# Altium PCB IOTv1.5.PcbDoc
Units mm, origin at the board's own origin, x right, y up, seen from the top; angles counter-clockwise.
Board outline 74.6 x 89.6 mm, 2 copper layers (Top Layer, Bottom Layer); 108 components, 83 nets, 385 pads, 75 vias.
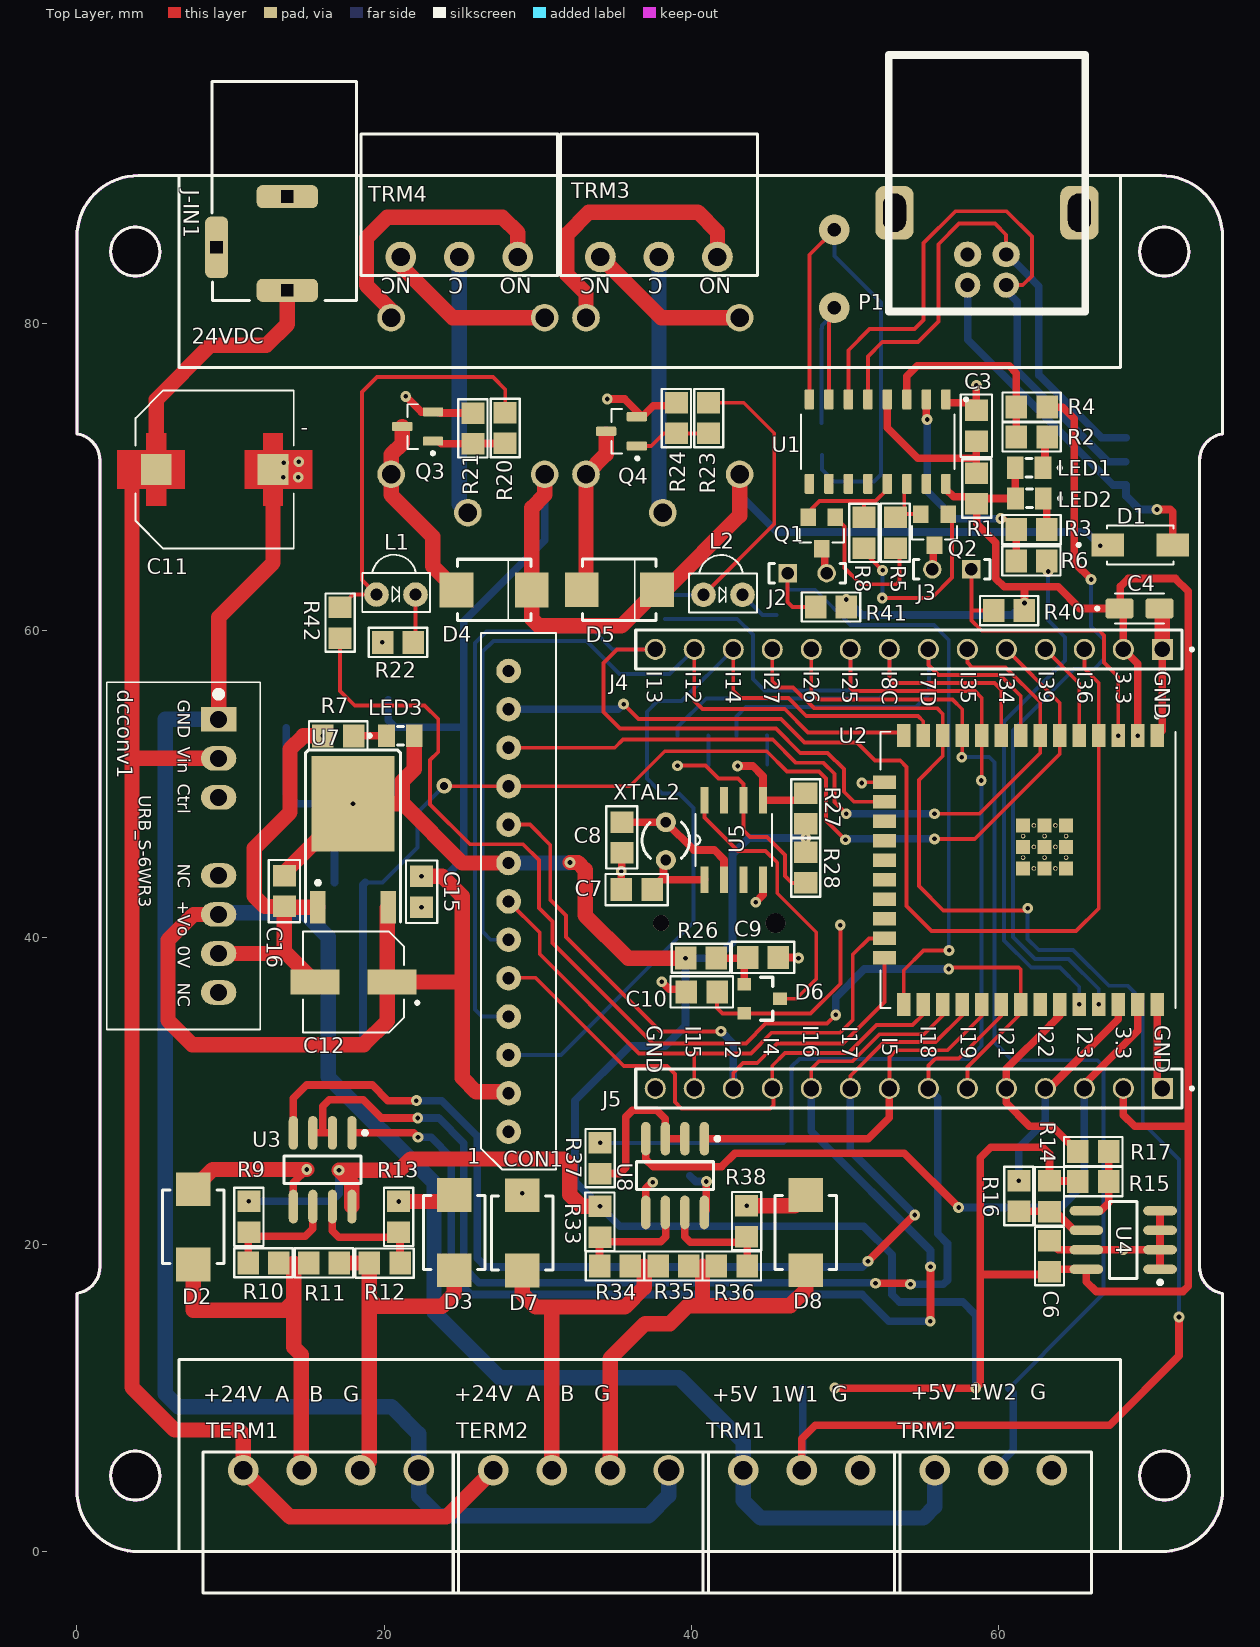
[diagram p0: Top Layer view]
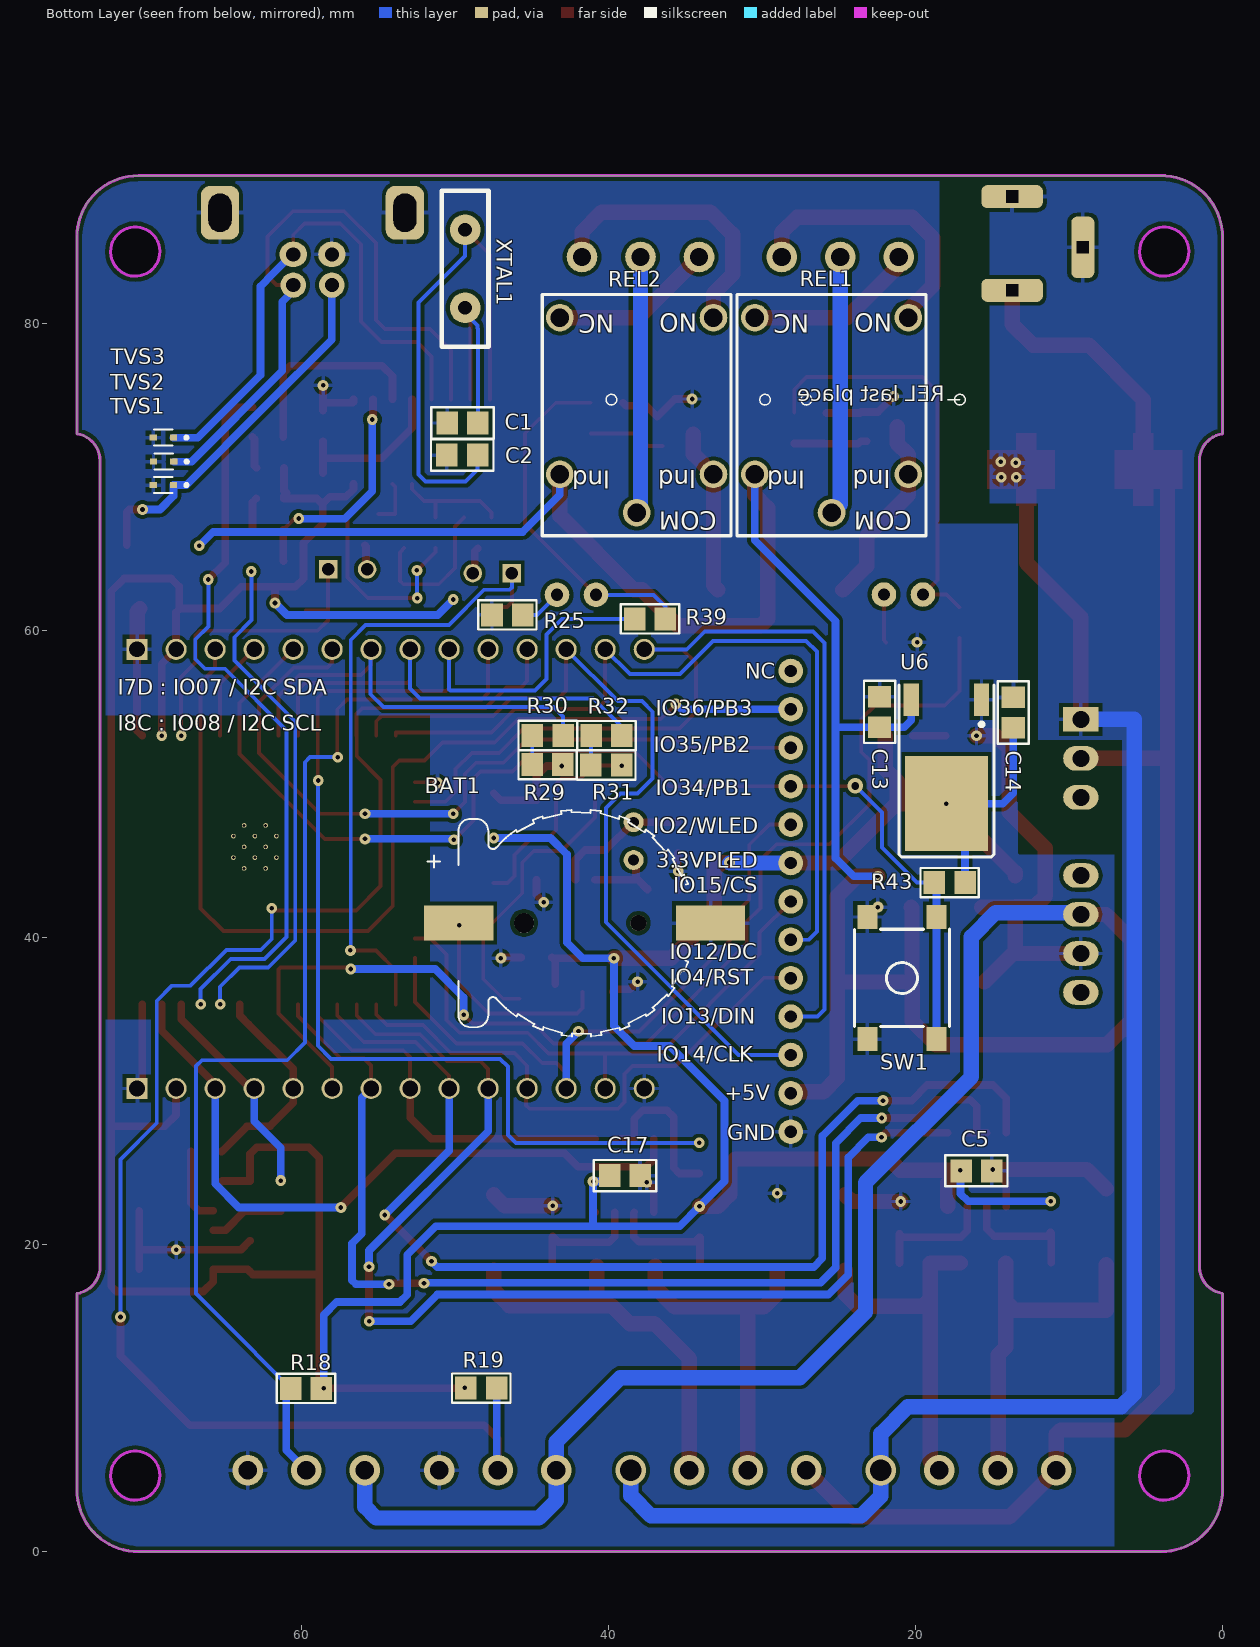
[diagram p1: Bottom Layer view, seen from below]
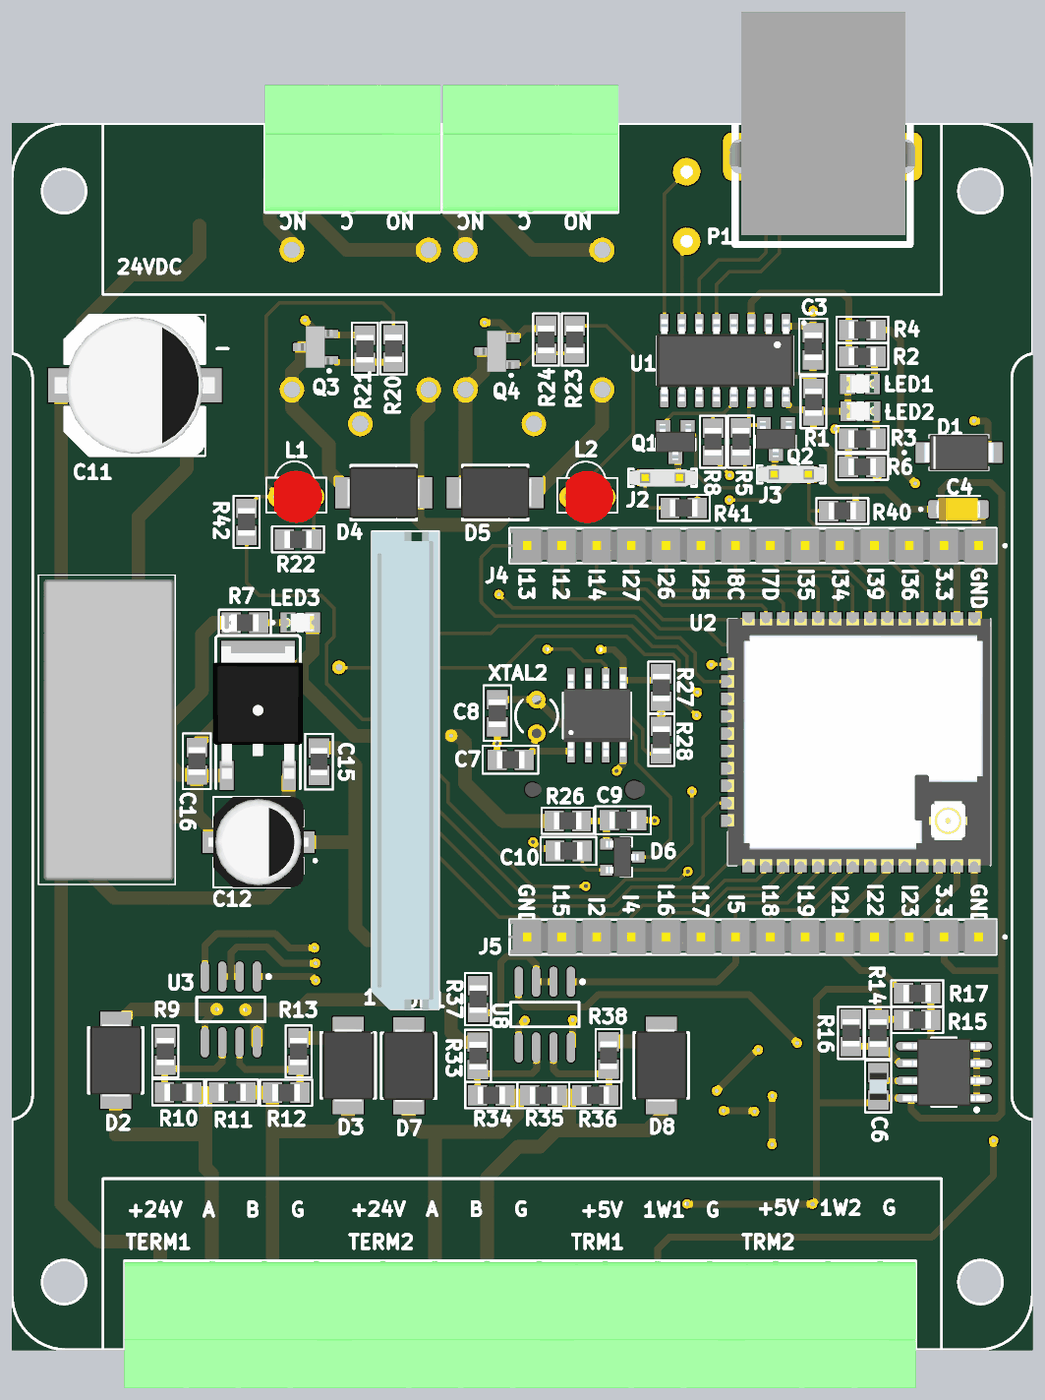
[diagram p2: 3D render of the assembled board from above, using the file's embedded part models]
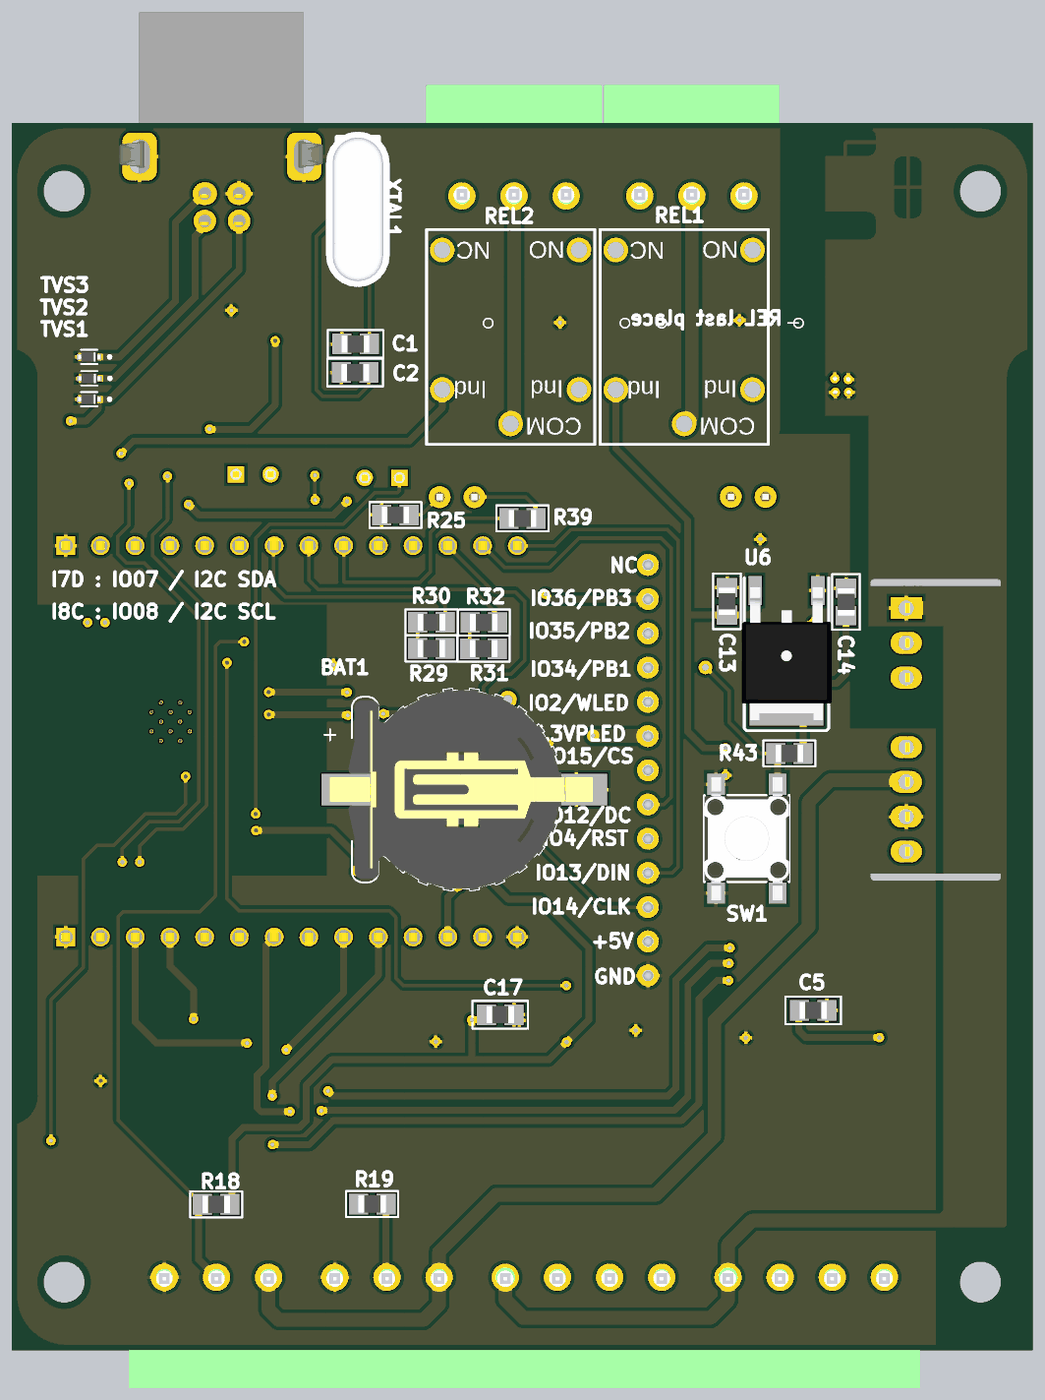
[diagram p3: 3D render of the assembled board from below, using the file's embedded part models]

## Layer stack, top to bottom
Top Solder: solder mask 0.0102, Solder Resist, Dk 3.5
Top Layer: signal copper 0.0356
Dielectric 1: dielectric 0.32, FR-4, Dk 4.8
Bottom Layer: signal copper 0.0356
Bottom Solder: solder mask 0.0102, Solder Resist, Dk 3.5

## Board outline
0,4 ccw(c4,4) 4,0 70.6,0 ccw(c70.6,4) 74.6,4 74.6,16.818 cw(c74.85,18.55) 73.1,18.55 73.1,71.05 cw(c74.85,71.05) 74.6,72.782 74.6,85.6 ccw(c70.6,85.6) 70.6,89.6 4,89.6 ccw(c4,85.6) 0,85.6 0,72.782 cw(c-0.25,71.05) 1.5,71.05 1.5,18.55 cw(c-0.25,18.55) 0,16.818

## Design rules (kind name [scope] priority, off if disabled: settings)
Clearance [All] p1: gap=0.254 ignorepadtopadclearanceinfootprint=FALSE
PolygonConnect [All] p1: connectstyle=Relief reliefconductorwidth=0.254 reliefentries=4 polygonreliefangle="90 Angle" airgapwidth=0.254
RoutingVias [All] p1: holewidth=0.711 width=1.27 viastyle="Through Hole" minholewidth=0.711 minwidth=1.27 maxholewidth=0.711 maxwidth=1.27
SolderMaskExpansion [All] p1: expansion=0.102 istentingtop=FALSE
UnRoutedNet [All] p1: checkbadconnections=TRUE
Width [All] p1: maxlimit=2 minlimit=0.254 preferedwidth=0.5
29 further rules are at their usual default settings.

## Classes and differential pairs
component class U_Temp_Sensor: R18 R19 TRM1 TRM2
component class U_RTC: BAT1 C7 C8 C9 C10 D6 R26 R27 R28 R29 R30 R31 R32 U5 XTAL2
component class U_RS485: C5 C17 D2 D3 D7 D8 R9 R10 R11 R12 R13 R33 R34 R35 R36 R37 R38 TERM1 TERM2 U3 U8
component class U_Relay: D4 D5 L1 L2 Q3 Q4 R20 R21 R22 R23 R24 R25 R39 R42 REL1 REL2 TRM3 TRM4
component class U_Power: C11 C12 C13 C14 C15 C16 dcconv1 J-IN1 U6 U7
component class U_OLED_LED_Connector: CON1
component class U_ESP32-S3: C1 C2 C3 C4 D1 J2 J3 J4 J5 LED1 LED2 LED3 P1 Q1 Q2 R1 R2 R3 R4 R5 R6 R7 R8 R40 R41 R43 SW1 TVS1 TVS2 TVS3 U1 U2 XTAL1
component class U_E2PROM: C6 R14 R15 R16 R17 U4

## Components (designator, comment, footprint, x,y, rotation, side; value= is the part's Value field where it differs from the comment)
BAT1 "CR1220" CR1220 41.76,40.93 r270 bottom
C1 "22pF" 0805#1 49.49,73.49 r180 bottom
C2 "22pF" 0805#1 49.51,71.4 r180 bottom
C3 "100nF" 0805#1 58.57,73.31 r270 top
C4 "100uf 10V TAN" TAN_SIZE_A 69.19,61.41 r0 top
C5 "100nF" 0805#1 16.03,24.8 r180 bottom
C6 "100nF" C0805 63.33,19.24 r270 top
C7 "18pF" 0805#2 36.45,43.11 r0 top
C8 "18pF" 0805#2 35.48,46.51 r90 top
C9 "100nF" 0805#2 44.67,38.69 r0 top
C10 "100nF" 0805#2 40.69,36.45 r180 top
C11 "CAP_EEEFKJ101V" CAP_EEEFK1J101V 8.97,70.46 r0 top
C12 "CAP_EEE1EA220AP" CAP_EEE1EA220AP 18.01,37.09 r180 top
C13 "100nF" 0805#1 22.33,54.68 r270 bottom
C14 "100nF" 0805#1 13.63,54.64 r270 bottom
C15 "100nF" 0805#2 22.44,42.97 r90 top
C16 "100nF" 0805#2 13.51,43.01 r90 top
C17 "100nF" 0805#1 38.91,24.48 r180 bottom
CON1 "10 Pin" "Mini SPOX 5267 - 13Pin" 28.11,27.342 r270 top
D1 "SS14" SS14 69.23,65.55 r0 top
D2 "TVS DIODE" DO-214AA 7.58,21.15 r270 top
D3 "TVS DIODE" DO-214AA 24.57,20.78 r270 top
D4 "Diode 1N5819" DO-214AA 27.17,62.62 r0 top
D5 "Diode 1N5819" DO-214AA 35.32,62.63 r0 top
D6 "BAS70-05" BAS70-05 44.61,36 r270 top
D7 "TVS DIODE" DO-214AA 28.99,20.75 r270 top
D8 "TVS DIODE" DO-214AA 47.46,20.78 r270 top
dcconv1 "URB_S-6WRS" DCDC 9.23,45.3 r270 top
J2 "HDR_1x2_MALE_2.54mm" HDR_1x2_MALE_2.54mm 47.55,63.71 r90 top
J3 "HDR_1x2_MALE_2.54mm" HDR_1x2_MALE_2.54mm 56.97,63.96 r270 top
J4 "HDR_1x14_MALE_2.54mm" HDR_1x14_MALE_2.54mm 54.17,58.75 r180 top
J5 "HDR_1x14_MALE_2.54mm" HDR_1x14_MALE_2.54mm 54.17,30.16 r180 top
J-IN1 "DCJ250-10-A_XX-X_REVA" "dc power jack" 13.7,95.73 r180 top
L1 "Green" LED-1 20.78,62.32 r90 top
L2 "Green" LED-1 42.07,62.3 r90 top
LED1 "RXD" LED-0805-G 62,70.57 r180 top
LED2 "TXD" LED-0805-G 62.02,68.58 r180 top
LED3 "POW" LED-0805-G 21.07,53.13 r0 top
P1 "440206-1" USB 58,82.47 r0 top
Q1 "S8050" S8050 48.5,66.33 r180 top
Q2 "S8050" S8050 55.84,66.54 r180 top
Q3 "NPN" MMBT2222A 22.19,73.26 r180 top
Q4 "NPN" MMBT2222A 35.46,72.95 r180 top
R1 "0R" R0805#1 58.59,69.23 r90 top
R2 "1K" R0805#1 62.17,72.58 r180 top
R3 "1K" R0805#1 62.16,66.55 r180 top
R4 "470R" R0805#1 62.17,74.52 r0 top
R5 "10K" R0805#1 53.29,66.35 r270 top
R6 "470R" R0805#1 62.15,64.51 r0 top
R7 "1K" R0805#1 17.02,53.12 r180 top
R8 "10K" R0805#1 51.25,66.34 r270 top
R9 "4.7K" R0805#1 11.2,21.8 r90 top
R10 "56R" R0805#1 12.15,18.81 r0 top
R11 "120R" R0805#1 16.09,18.8 r180 top
R12 "56R" R0805#1 20.04,18.79 r180 top
R13 "4.7K" R0805#1 20.95,21.8 r270 top
R14 "4.7K" R0805#1 63.33,23.14 r90 top
R15 "4.7K" R0805#1 66.18,24.1 r180 top
R16 "22R" R0805#1 61.33,23.16 r90 top
R17 "22R" R0805#1 66.18,26.05 r180 top
R18 "4.7K" R0805#1 59.68,10.63 r180 bottom
R19 "4.7K" R0805#1 48.27,10.65 r0 bottom
R20 "1K" R0805#1 27.89,73.16 r270 top
R21 "10K" R0805#1 25.79,73.14 r270 top
R22 "1K" R0805#1 20.91,59.21 r0 top
R23 "1K" R0805#1 41.14,73.81 r270 top
R24 "10K" R0805#1 39.04,73.81 r270 top
R25 "1K" R0805#1 46.57,60.99 r180 bottom
R26 "22R" R0805#1 40.63,38.64 r180 top
R27 "2.2K" R0805#1 47.46,48.39 r270 top
R28 "2.2K" R0805#1 47.46,44.55 r90 top
R29 "22R" R0805#1 43.95,51.24 r0 bottom
R30 "0R" R0805#1 43.94,53.15 r180 bottom
R31 "22R" R0805#1 40.13,51.22 r0 bottom
R32 "0R" R0805#1 40.11,53.14 r180 bottom
R33 "4.7K" R0805#1 34.06,21.48 r90 top
R34 "56R" R0805#1 35.03,18.6 r0 top
R35 "120R" R0805#1 38.84,18.6 r180 top
R36 "56R" R0805#1 42.64,18.6 r180 top
R37 "0R" R0805#1 34.07,25.62 r90 top
R38 "4.7K" R0805#1 43.61,21.52 r270 top
R39 "0R" R0805#1 37.28,60.74 r180 bottom
R40 "10K" R0805#1 60.7,61.28 r0 top
R41 "10K" R0805#1 49.1,61.51 r0 top
R42 "0R" R0805#1 17.14,60.49 r90 top
R43 "10K" R0805#2 17.77,43.57 r180 bottom
REL1 "Milon mini 5v relay" HLS-T78-DC5V 25.46,74 r0 bottom
REL2 "Milon mini 5v relay" HLS-T78-DC5V 38.15,74 r0 bottom
SW1 "Tactile-Switch" SW-Tactile-SMD 20.88,37.35 r270 bottom
TERM1 "MC 1,5/ 4-G-3,81" "MC 1,5/ 4-G-3,81" 16.54,1.9 r0 top
TERM2 "MC 1,5/ 4-G-3,81" "MC 1,5/ 4-G-3,81" 32.82,1.9 r0 top
TRM1 "MC 1,5/ 3-G-3,81" "MC 1,5/ 3-G-3,81" 47.19,1.9 r0 top
TRM2 "MC 1,5/ 3-G-3,81" "MC 1,5/ 3-G-3,81" 59.66,1.9 r0 top
TRM3 "MC 1,5/ 3-G-3,81" "MC 1,5/ 3-G-3,81" 37.9,87.7 r180 top
TRM4 "MC 1,5/ 3-G-3,81" "MC 1,5/ 3-G-3,81" 24.9,87.7 r180 top
TVS1 "LESD5D5.0CT1G" TVS 68.97,69.45 r0 bottom
TVS2 "LESD5D5.0CT1G" TVS 68.949,70.972 r0 bottom
TVS3 "LESD5D5.0CT1G" TVS 68.97,72.54 r0 bottom
U1 "CH340G" CH340G 52.14,72.28 r270 top
U2 "ESP32_WROOM_32UE" ESP32_WROOM_32UE(M113EH6400UH3Q0) 61.939,44.387 r270 top
U3 "ADM3485" NSO8_N 16,24.87 r270 top
U4 "AT24C512C-SSHD" 8S1_N 68.129,20.291 r180 top
U5 "RTC" PCF8563T 42.77,46.34 r90 top
U6 "LD1117-33" TO-252 17.98,52.09 r0 bottom
U7 "LD1117-33" TO-252 17.98,45.33 r0 top
U8 "ADM3485" NSO8_N 38.95,24.49 r270 top
XTAL1 "12MHZ" XTAL-1 49.32,83.32 r90 bottom
XTAL2 "32.768KHZ" R38 38.35,46.33 r0 top

## Footprints (in the part's own frame and the unit in brackets; to place one, negate y for a bottom-side part, rotate by r counter-clockwise, add the part's x,y. Pads: shape width x height; smd on the part's side, far side on the other; paste and mask are expansions set on the pad)
8S1_N [mm] "SOIC, 8-Leads, Body 4.9x3.9mm, Pitch 1.27mm, IPC Medium Density"
  oval 2.2x0.6 smd: 1(-2.4,1.905) 2(-2.4,0.635) 3(-2.4,-0.635) 4(-2.4,-1.905) 5(2.4,-1.905) 6(2.4,-0.635) 7(2.4,0.635) 8(2.4,1.905)
  silkscreen extent -2.53,-2.5 0.9,2.88, body extent -3,-2.45 3,2.45, height 1.75
0805#1 [mm]
  rect 1.4x1.5 smd: 1(-1,0) 2(1,0)
  silkscreen extent -2.03,-1.02 2.03,1.02, body extent -1,-0.63 1,0.63, height 0.58
0805#2 [mm]
  rect 1.4x1.5 smd mask+0.102: 1(-1,0) 2(1,0)
  silkscreen extent -2.03,-1.02 2.03,1.02, body extent -1,-0.63 1,0.63, height 0.58
BAS70-05 [mm] "Common cathode dual schottky diode"
  rect 0.8x0.9 smd: 1(-0.95,-1.15) 2(0.95,-1.15) 3(0,1.175)
  silkscreen extent -1.4,-0.1 1.4,0.7, body extent -1.46,-1.2 1.46,1.2, height 1.2
C0805 [mm]
  rect 1.4x1.5 smd mask+0.102: 1(-1,0) 2(1,0)
  silkscreen extent -1.9,-0.95 1.9,0.95, body extent -1,-0.63 1,0.63, height 1.26
CAP_EEE1EA220AP [mm]
  rect 3.2x1.6 smd: 1(-2.5,0) 2(2.5,0)
  silkscreen extent -4.25,-3.3 3.3,3.3, body extent -3.65,-3.3 3.65,3.3, height 5.8
CAP_EEEFK1J101V [mm]
  rect 2x2 smd paste-2 mask+0: 1(-3.8,0) 2(3.8,0)
  Top Layer region: 4.45,1.25 6.35,1.25 6.35,-1.25 4.45,-1.25 4.45,-2.35 3.15,-2.35 3.15,-1.25 1.95,-1.25 1.95,1.25 3.15,1.25 3.15,2.35 4.45,2.35
  Top Layer region: -3.15,1.25 -1.95,1.25 -1.95,-1.25 -3.15,-1.25 -3.15,-2.35 -4.45,-2.35 -4.45,-1.25 -6.35,-1.25 -6.35,1.25 -4.45,1.25 -4.45,2.35 -3.15,2.35
  silkscreen extent -5.15,-5.15 5.15,5.15, body extent -5.85,-5.15 5.85,5.15, height 10.2
CH340G [mm] "USB to Serial Converter"
  rrect25% 1.31x0.62 smd: 1(-2.75,4.445) 2(-2.75,3.175) 3(-2.75,1.905) 4(-2.75,0.635) 5(-2.75,-0.635) 6(-2.75,-1.905) 7(-2.75,-3.175) 8(-2.75,-4.445) 9(2.75,-4.445) 10(2.75,-3.175) 11(2.75,-1.905) 12(2.75,-0.635) 13(2.75,0.635) 14(2.75,1.905) 15(2.75,3.175) 16(2.75,4.445)
  silkscreen extent -2.85,-5 1.78,5.85, body extent -3,-5 3,5, height 1.8
CR1220 [mm] "SMD RTC Battery Holder"
  rect 2.3x4.5 smd: N(0,8.425) P(0,-7.975)
  round 1.3 hole 1.3 unplated: ""(0,-3.725)
  round 1.05 hole 1.05 unplated: ""(0,3.725)
  silkscreen extent -7.37,-10 7.37,6.96, body extent -7.37,-9.6 7.37,9.6, height 4.25
"dc power jack" [mm]
  rrect50% 4x1.5 hole 0.8 square: 1(0,7.5) 2(0,13.6)
  rrect50% 1.5x4 hole 0.8 square: 3(4.6,10.8)
  silkscreen extent -4.5,0 4.9,14.27, body extent -4.52,0.07 4.88,14.27, height 11.01
DCDC [mm]
  rect 1.6x2.3 hole 1.1: 1(-8.89,0)
  oval 1.6x2.3 hole 1.1: 2(-6.35,0) 3(-3.81,0) 5(1.27,0) 6(3.81,0) 7(6.35,0) 8(8.89,0)
  silkscreen extent -11.3,-7.3 11.3,2.7, body extent -11,-6.91 11,2.59, height 11.51
DO-214AA [mm] "Molded Diode, 2-Leads, Body 4.4x3.6mm, IPC Medium Density"
  rect 2.2x2.26 smd mask+0.102: 1(-2.45,0) 2(2.45,0)
  silkscreen extent -2.4,-2 2.4,2, body extent -2.7,-1.85 2.7,1.85, height 2.19
ESP32_WROOM_32UE(M113EH6400UH3Q0) [mm]
  rect 1.5x0.9 smd: 1(-8.75,8.41) 2(-8.75,7.14) 3(-8.75,5.87) 4(-8.75,4.6) 5(-8.75,3.33) 6(-8.75,2.06) 7(-8.75,0.79) 8(-8.75,-0.48) 9(-8.75,-1.75) 10(-8.75,-3.02) 11(-8.75,-4.29) 12(-8.75,-5.56) 13(-8.75,-6.83) 14(-8.75,-8.1) 25(8.75,-8.1) 26(8.75,-6.83) 27(8.75,-5.56) 28(8.75,-4.29) 29(8.75,-3.02) 30(8.75,-1.75) 31(8.75,-0.48) 32(8.75,0.79) 33(8.75,2.06) 34(8.75,3.33) 35(8.75,4.6) 36(8.75,5.87) 37(8.75,7.14) 38(8.75,8.41)
  rect 0.9x1.5 smd: 15(-5.71,-9.35) 16(-4.44,-9.35) 17(-3.17,-9.35) 18(-1.9,-9.35) 19(-0.63,-9.35) 20(0.64,-9.35) 21(1.91,-9.35) 22(3.18,-9.35) 23(4.45,-9.35) 24(5.72,-9.35)
  rect 0.9x0.9 smd: 39_1(-2.9,2.47) 39_2(-1.5,2.47) 39_3(-0.1,2.47) 39_4(-2.9,1.07) 39_5(-1.5,1.07) 39_6(-0.1,1.07) 39_7(-2.9,-0.33) 39_8(-1.5,-0.33) 39_9(-0.1,-0.33)
  round 0.3 hole 0.2: 39_10(-2.2,2.47) 39_11(-0.8,2.47) 39_12(-2.9,1.77) 39_13(-1.5,1.77) 39_14(-0.1,1.77) 39_15(-2.2,1.07) 39_16(-0.8,1.07) 39_17(-2.9,0.37) 39_18(-1.5,0.37) 39_19(-0.1,0.37) 39_20(-2.2,-0.33) 39_21(-0.8,-0.33)
  silkscreen extent -10.1,-9.6 9,9.6, body extent -9,-9.6 9,9.6, height 3.35
HDR_1x2_MALE_2.54mm [mm]
  rect 1.2x1.2 / inner round 1.01 / far side rect 1.2x1.2 hole 0.8: 01(0,1.27)
  round 1.2 hole 0.8: 02(0,-1.27)
  silkscreen extent -0.64,-2.49 0.64,2.49, body extent -0.64,-2.54 0.64,2.44, height 7.47
HDR_1x14_MALE_2.54mm [mm]
  rect 1.37x1.37 hole 1.02: 01(-16.51,0)
  round 1.37 hole 1.02: 02(-13.97,0) 03(-11.43,0) 04(-8.89,0) 05(-6.35,0) 06(-3.81,0) 07(-1.27,0) 08(1.27,0) 09(3.81,0) 10(6.35,0) 11(8.89,0) 12(11.43,0) 13(13.97,0) 14(16.51,0)
  silkscreen extent -18.53,-1.27 17.78,1.27, body extent -17.78,-1.27 17.91,1.27, height 5.21
HLS-T78-DC5V [mm] "Milon mini 5V relay"
  round 1.8 hole 1.2 mask+0.05: 1(0,6.35) 2(-5,3.85) 3(5,3.85) 4(-5,-6.35) 5(5,-6.35)
  silkscreen extent -6.15,-7.85 6.15,7.85, body extent -6.15,-7.85 6.15,7.85, height 14
LED-1 [mm] "LED; 2 Leads"
  round 1.6 hole 0.8: 1(0,1.27) 2(0,-1.27)
  silkscreen extent -1.14,-2.2 2.59,2.2, body extent -1.9,-1.9 1.9,1.6, height 6.5
LED-0805-G [mm]
  rect 1.1x1.45 smd: 1(0.9,0) 2(-0.9,0)
  silkscreen extent -2.1,-0.6 0.2,0.6, body extent -1,-0.63 1,0.63, height 0.7
"MC 1,5/ 3-G-3,81" [mm] "Phoenix board mount 3.81 Pitch Terminal 3Position"
  round 2 hole 1.2 mask+0.05: 1(-3.81,3.4) 2(0,3.4) 3(3.81,3.4)
  silkscreen extent -6.41,-4.6 6.41,4.6, body extent -6.41,-4.7 6.41,4.6, height 7.26
"MC 1,5/ 4-G-3,81" [mm]
  round 2 hole 1.2 mask+0.05: 1(-5.715,3.4) 2(-1.905,3.4) 3(1.905,3.4)
  round 2 hole 1.4 mask+0.05: 4(5.715,3.4)
  silkscreen extent -8.31,-4.6 8.31,4.6, body extent -8.31,-4.7 8.31,4.6, height 7.26
"Mini SPOX 5267 - 13Pin" [mm] "Mini SPOX 5267 - 10Pin"
  round 1.6 hole 0.8 mask+0.05: 1(0,0) 2(-2.5,0) 3(-5,0) 4(-7.498,0) 5(-9.998,0) 6(-12.498,0) 7(-14.998,0) 8(-17.498,0) 9(-19.998,0) 10(-22.498,0) 11(-25,0) 12(-27.502,0) 13(-30.004,0)
  silkscreen extent -32.46,-1.8 2.45,3.1, body extent -32.44,-1.81 2.46,3.09, height 6
MMBT2222A [mm]
  rrect25% 1.32x0.6 smd: 1(-1,0.95) 2(-1,-0.95) 3(1,0)
  silkscreen extent -1.09,-1.45 0.65,1.84, body extent -1.27,-1.52 1.33,1.52, height 1.21
NSO8_N [mm] "SOIC, 8-Leads, Body 4.9x3.9mm, Pitch 1.27mm, IPC Medium Density"
  oval 2.2x0.6 smd: 1(-2.4,1.905) 2(-2.4,0.635) 3(-2.4,-0.635) 4(-2.4,-1.905) 5(2.4,-1.905) 6(2.4,-0.635) 7(2.4,0.635) 8(2.4,1.905)
  silkscreen extent -2.52,-2.5 0.9,2.88, body extent -2,-2.5 2,2.5, height 1.75
PCF8563T [mil] "RTC Chip"
  rect 67x21 smd: 1(-102,75) 2(-102,25) 3(-102,-25) 4(-102,-75) 5(102,-75) 6(102,-25) 7(102,25) 8(102,75)
  silkscreen extent -66,-98 66,98, body extent -118,-96 118,96, height 69
R38 [mm] "Crystal, Thru-Hole; 2 Leads; Body 3.1 x 8.2 mm (Dia.xH)"
  round 1.3 hole 0.7: 1(0,1.169) 2(0,-1.296)
  silkscreen extent -1.55,-1.19 1.55,1.17
R0805#1 [mm]
  rect 1.4x1.5 smd mask+0.102: 1(-1,0) 2(1,0)
  silkscreen extent -1.9,-0.95 1.9,0.95, body extent -1,-0.63 1,0.63, height 0.58
R0805#2 [mm]
  rect 1.4x1.5 smd: 1(-1,0) 2(1,0)
  silkscreen extent -1.9,-0.95 1.9,0.95, body extent -1,-0.63 1,0.63, height 0.58
S8050 [mil]
  rect 40x45 smd: 1(-35,-40) 2(35,-40) 3(0,40)
  silkscreen extent -58,-10 58,25, body extent -57,-51 57,51, height 55
SS14 [mm]
  rect 2.12x1.5 smd: A(2.115,0) C(-2.115,0)
  silkscreen extent -4.1,-1.28 2.16,1.28, body extent -2.57,-1.28 2.57,1.28, height 2.31
SW-Tactile-SMD [mm]
  rect 1.55x1.3 smd mask+0.05: 1(-3.975,2.25) 2(-3.975,-2.25) 3(3.975,2.25) 4(3.975,-2.25)
  silkscreen extent -3.18,-3.1 3.15,3.1, body extent -4.5,-3.1 4.5,3.1, height 5
TAN_SIZE_A [mm]
  rrect25% 1.81x1.32 smd: 1(-1.3,0) 2(1.3,0)
  silkscreen extent -2.85,-0.98 1.6,0.98, body extent -1.6,-0.8 1.6,0.8, height 1.81
TO-252 [mm]
  rect 1x2.1 smd: 1(-2.285,-3.375) 3(2.285,-3.375)
  rect 5.4x6.2 smd: 4(0,3.375)
  silkscreen extent -3.08,-4.33 3.09,6.86, body extent -3.29,-3.62 3.29,6.08, height 2.31
TVS [mm]
  rect 0.48x0.4 smd: 1(-0.66,0) 2(0.66,0)
  silkscreen extent -1.6,-0.52 0.6,0.52, body extent -0.8,-0.4 0.8,0.4, height 0.7
USB [mm]
  round 1.651 hole 0.92: 1(0,0) 2(2.51,0)
  oval 1.778x1.651 hole 0.92: 3(2.51,2) 4(0,2)
  rrect50% 2.5x3.5 hole 1.5 slot 2.5 at 90 deg: 5(7.28,4.71) 6(-4.76,4.71)
  silkscreen extent -5.14,-1.71 7.66,14.99, body extent -6.12,-1.04 8.74,15.26, height 10.84
XTAL-1 [mm]
  round 2 hole 0.9: 1(-2.33,0) 2(2.75,0)
  silkscreen extent -4.87,-1.52 5.29,1.52, body extent -5.68,-2.33 5.68,2.32, height 3.6

## Part data
BAT1: "CR1220 SMD Battery holder"
C1 C2: library part 2-Cap_4, "Bipolar Capacitor", Type=MKT
C3: library part Cap_2, "Capacitor", LatestRevisionDate=17-Jul-2002, LatestRevisionNote="Re-released for DXP Platform.", PackageReference=RAD-0.3, Published=8-Jun-2000, Publisher="Altium Limited"
C5 C6 C7 C8 C9 C10 C13 C14 C15 C16 C17: library part 2-Cap, "Bipolar Capacitor", Type=MKT
CON1: library part "Mini-SPOX 5267- 13Pin", "Mini SPOX 5267 Series / 10 Pin"
D4 D5: library part "Diode 1N4148", "High Conductance Fast Diode", Code_JEDEC=DO-204-AH, ComponentLink1Description="Manufacturer Link", ComponentLink1URL=http://www.fairchildsemi.com/, ComponentLink2Description=Datasheet, ComponentLink2URL=http://www.fairchildsemi.com/ds/1N%2F1N4148.pdf, DatasheetVersion=1997, LatestRevisionDate=17-Jul-2002, LatestRevisionNote="Re-released for DXP Platform.", PackageDescription="Diode, Axial; Body 3.8 x 1.9 mm (LxDia. max), Lead Dia. 0.53 mm (max)", PackageReference=DO-35, Published=8-Jun-2000, Publisher="Altium Limited"
D6: "Common cathode dual schottky diode"
J-IN1: "Power Barrel Connector Jack 2.55mm ID _0.100_, 5.50mm OD _0.217_ Through Hole, Right Angle", Package=None, Availability=Unavailable, MF="Global Connector Technology", MP=DCJ250-10-A-K1-K, Price=None, SnapEDA_Link=https://www.snapeda.com/parts/DCJ250-10-A-K1-K/Global%20Connector%20Technology/view-part/813036/?ref=snap
L1 L2: library part LED1_1, "LEd 3 mil", LatestRevisionDate=08-Jul-2005, LatestRevisionNote="Mech Layer 1 removed.", PackageDescription="LED; 2 Leads", PackageReference=LED-1, Published=8-Jun-2000, Publisher="Altium Limited"
LED1 LED2 LED3: library part LED_0805
P1: "USB 1.1, Vertical, Thru-Hole, B Type, Receptacle, 4 Position, White", PackageDocument=04-May-2001, ComponentLink1Description="Manufacturer Link", ComponentLink1URL=http://www.tycoelectronics.com/, ComponentLink2Description="Packaging Specification", ComponentLink2URL=http://ecommas.tycoelectronics.com/commerce/DocumentDelivery/DDEController?Action=showdoc&DocId=Customer+Drawing%7F440206%7FA%7Ftif%7FEnglish%7FC_440206_A.tif, ContactMaterial="Copper Alloy", ContactPlating="Gold (30) over Nickel", DatasheetDocument=04-May-2001, DrillSize="Corresponds to nominal value.", HousingMaterial=Thermoplastic, PackageReference=440206, PanelGround=Without, PCB_Layout="Complies with manufacturer's recommendation.", Published=15-Jul-2004, Publisher="Altium Limited", TerminationLength="2.84mm [0.112in.]"
Q3 Q4: library part MMBT2222A
R1 R2 R3 R4 R5 R6 R7 R8: library part Res2, "Resistor", LatestRevisionDate=17-Jul-2002, LatestRevisionNote="Re-released for DXP Platform.", PackageReference=AXIAL-0.4, Published=8-Jun-2000, Publisher="Altium Limited"
R9 R10 R11 R12 R13 R14 R15 R16 R17 R18 R19 R20 R21 R22 R23 R24 R25 R26 R27 R28 R29 R30 R31 R32 R33 R34 R35 R36 R37 R38 R39 R40 R41 R42 R43: library part myRes_1
REL1 REL2: library part HLS-T78
TVS1 TVS2 TVS3: library part "TVS 5V"
U1: "USB to Serial Converter"
U3 U8: library part MAX485CSA, "Low-Power, Slew-Rate-Limited RS-485/RS-422 Transceiver", Code_IPC=SOIC127P600-8, Code_JEDEC=MS-012-AA, ComponentLink1Description="Manufacturer Link", ComponentLink1URL=http://www.maxim-ic.com/, ComponentLink2Description=Datasheet, ComponentLink2URL=http://pdfserv.maxim-ic.com/en/ds/MAX1487-MAX491.pdf, DatasheetVersion=Feb-1996, LatestRevisionDate=13-Apr-2006, LatestRevisionNote="IPC-7351 Footprint Added.", PackageDescription="8-Pin Small Outline Integrated Circuit 1.27 mm Pitch", PackageReference=NSO8, Published=16-Jan-2001, Publisher="Altium Limited"
U4: library part AT24C01BN-SP25-B, "1Kbit (128 x 8), 2-wire Bus Automotive Serial EEPROM with Write Protect, 2.5V, 8-Pin SOIC, Bulk", Code_IPC=SOIC127P600-8, Code_JEDEC=MS-012-AA, ComponentLink1Description="Manufacturer Link", ComponentLink1URL=http://www.atmel.com/products/serial/default.asp, ComponentLink2Description=Datasheet, ComponentLink2URL=http://www.atmel.com/dyn/resources/prod_documents/doc8517.pdf, ComponentLink3Description="Atmel.com Home", ComponentLink3URL=http://www.atmel.com, DatasheetVersion="8517C,  Jan-2009", PackageDescription="8-Lead (0.150\" Wide Body), Plastic Gull Wing Small Outline (JEDEC SOIC)", PackageReference=8S1, PackageVersion="revC, Mar-2005", Published=20-Sep-2010, Publisher="Altium Limited"
U5: library part PCF8563T_F4
U6 U7: "3.3V Regulator"
XTAL1: library part XTAL, "Crystal Oscillator", LatestRevisionDate=17-Jul-2002, LatestRevisionNote="Re-released for DXP Platform.", PackageReference=R38, Published=8-Jun-2000, Publisher="Altium Limited"
XTAL2: library part XTAL_1, "Crystal Oscillator", LatestRevisionDate=17-Jul-2002, LatestRevisionNote="Re-released for DXP Platform.", PackageReference=R38, Published=8-Jun-2000, Publisher="Altium Limited"

## Free pads (board coordinates)
  round 0 hole 3 unplated mask+0.05: 2(3.8,4.95) 2(3.8,84.65) 2(70.8,4.95) 2(70.8,84.65)

## Via types
v1: diameter 0.7, hole 0.3, Top Layer to Bottom Layer, 74 vias
v2: diameter 1, hole 0.5, Top Layer to Bottom Layer, 1 vias

## Nets (pads, with @x,y where several pads share a name; then routed paths per layer and width w, separated by ;. In a path a pad name is that pad's centre, name@x,y a point inside that pad or via, vN(x,y) a via of type N, cw(c..) or ccw(c..) an arc to the next point about the centre after c; other vN are vias at no path point)
1W_1: J4.10 R18.1 TRM2.2 U2.11 | length 74
  Top Layer w0.254: J4.10 47.82,55.9 48.24,55.48 57.02,55.48 57.649,54.851 57.649,51.759 v1(57.62,51.73)
  Bottom Layer w0.254: v1(57.62,51.73) 59.41,51.73 59.74,51.4 59.74,33.16 60.9,32 66.46,32 66.85,31.61 66.85,16.8 65.26,15.21 R18.1
  Bottom Layer w0.5: TRM2.2 60.97,6.61 60.97,10.34 R18.1
1W_2: J4.11 R19.1 TRM1.2 U2.12 | length 103.2
  Top Layer w0.254: J4.11 45.28,56.68 45.685,56.275 46.635,56.275 47.99,54.92 56,54.92 56.38,54.54 U2.12 ; U2.12 56.379,51.809 54.82,50.25 54.82,43.35 56.41,41.76 61.78,41.76 v1(61.91,41.89)
  Top Layer w0.5: TRM1.2 47.19,7.35 48.08,8.24 67.24,8.24 71.76,12.76 v1(71.76,15.28)
  Bottom Layer w0.254: v1(61.91,41.89) 61.91,39.89 62.63,39.17 64.87,39.17 67.189,36.851 68.409,36.851 69.4,35.86 69.4,27.9 71.76,25.54 v1(71.76,15.28)
  Bottom Layer w0.5: TRM1.2 47.27,5.38 R19.1
3.3V_VDD: C9.1 D6.1 R26.1 | length 3.8
  Top Layer w0.5: R26.1 C9.1@43.62,38.64 ; D6.1 43.46,38.48 C9.1@43.62,38.64 ; C9.1 C9.1@43.62,38.64
+3.3V: C4.1 C5.1 C6.2 C14.2 C16.2 C17.1 CON1.8 J4.02 J5.02 LED1.1 LED2.1 LED3.1 R1.1 R9.2 R14.2 R15.2 R18.2 R19.2 R26.2 R27.2 R28.2 R33.2 R40.2 R41.2 R43.2 U1.16 U2.2 U3.8 U4.8 U6.4 U7.4 U8.8 | length 308.5
  Top Layer w0.5: U8.8 40.99,22.225 v1(40.99,24.1) ; v1(49.34,10.66) 49.35,10.65 v1(58.53,10.65) 58.82,10.94 58.82,18.19 ; U1.16 56.585,69.185 57.09,68.68 58.14,68.68 R1.1 ; LED2.1@60.943,68.932 61.12,68.755 LED2.1 58.99,68.58 58.64,68.23 R1.1 ; LED1.1 61.11,70.56 61.11,69.1 LED2.1@61.12,69.09 ; v1(61.7,61.77) 61.7,62.82 ; R15.2 65.14,24.14 R14.2 63.33,25.89 62.89,26.33 59.51,26.33 58.82,25.64 58.82,18.19 ; J5.02 68.14,28.43 68.88,27.69 72.36,27.69 ; U2.2 69.079,57.811 J4.02 68.14,61.16 C4.1 ; R1.1 58.59,66.94 59.84,65.69 59.84,63.36 60.38,62.82 61.7,62.82 ; 58.82,18.19 58.96,18.05 63.14,18.05 C6.2 63.476,18.386 U4.8 65.729,17.581 66.37,16.94 72.02,16.94 72.36,17.28 72.36,27.69 ; 61.7,62.82 63.889,62.82 65.299,61.41 C4.1 ; C4.1 67.94,61.46 67.94,62.84 68.46,63.36 71.53,63.36 72.36,62.53 72.36,27.69
  Top Layer w1: C16.2 13.51,44.235 v1(17.98,48.705) 21.225,48.705 ; U3.8 17.905,24.005 v1(17.07,24.84) 21,24.84 21.73,25.57 31.73,25.57 32.09,25.21 32.09,23.25 32.86,22.48 v1(34.06,22.48) ; LED3.1 21.97,50.95 21.19,50.17 21.19,48.74 21.225,48.705 ; CON1.8 25.09,44.84 21.225,48.705 ; v1(32.11,44.87) 32.63,44.87 33.1,44.4 33.1,41.43 35.89,38.64 v1(39.63,38.64)
  Bottom Layer w0.5: v1(11.19,22.81) 16.57,22.81 17.07,23.31 v1(17.07,24.84) ; C14.2 13.63,49.39 14.315,48.705 v1(17.98,48.705) 16.77,47.495 R43.2 ; v1@32.08,44.84 v1(32.11,44.87) ; C17.1 40.29,24.1 v1(40.99,24.1) 40.99,21.19 ; v1(47.46,46.47) 43.76,46.47 42.69,45.4 42.69,39.668 41.662,38.64 v1(39.63,38.64) 39.63,34.24 38.315,32.925 35.995,32.925 32.43,29.36 32.43,24.11 v1(34.06,22.48) 35.35,21.19 40.99,21.19 ; v1(50.1,62) 51.11,60.99 60.92,60.99 v1(61.7,61.77) ; v1(58.53,10.65) 58.53,15.41 57.68,16.26 53.56,16.26 53.08,16.74 53.08,19.33 51.22,21.19 40.99,21.19
  Bottom Layer w1: CON1.8 v1@32.08,44.84
  other v1: 69.078,53.138
+24V: C11.1 dcconv1.2 J-IN1.2 TERM1.1 TERM2.1 | length 113.4
  Top Layer w1: dcconv1.2 3.63,51.65 3.59,51.61 ; J-IN1.2 13.7,79.92 12.34,78.56 8.71,78.56 5.17,75.02 5.17,71.39 C11.1 4.674,69.964 4.044,69.964 3.59,69.51 3.59,51.61 ; TERM2.1 27.087,5.3 24.057,2.27 13.873,2.27 10.843,5.3 TERM1.1 10.825,7.635 10.54,7.92 6.37,7.92 3.59,10.7 3.59,51.61
COM_1: REL2.1 TRM3.2 | length 16.8
  Bottom Layer w1: TRM3.2 37.9,67.9 REL2.1
COM_2: REL1.1 TRM4.2 | length 16.9
  Bottom Layer w1: TRM4.2 24.9,68.21 REL1.1
D+: P1.3 TVS3.1 U1.5 | length 36.1
  Top Layer w0.254: U1.5 51.505,77.825 52.44,78.76 54.76,78.76 56.09,80.09 56.09,85.13 57.45,86.49 59.77,86.49 60.51,85.75 P1.3
  Bottom Layer w0.5: P1.3 60.574,84.47 61.84,83.204 62.64,82.404 62.64,76.62 66.72,72.54 TVS3.1
D-: P1.2 TVS2.1 U1.6 | length 42.4
  Top Layer w0.254: U1.6 50.235,78.225 51.62,79.61 54.54,79.61 55.13,80.2 55.13,85.21 57.2,87.28 60.54,87.28 62.19,85.63 62.19,83.07 61.59,82.47 P1.2
  Bottom Layer w0.5: P1.2 60.51,82.09 61.22,81.38 61.22,76.89 67.138,70.972 TVS2.1
DTR: Q1.2 R8.1 U1.13 | length 7.5
  Top Layer w0.254: Q1.2 47.611,67.671 48.35,68.41 52.01,68.41 52.775,69.175 U1.13 ; R8.1 51.25,68.4 51.26,68.41
ESP32_SCL: J4.08 R32.2 U2.9 | length 30.5
  Top Layer w0.254: J4.08 52.9,56.73 53.08,56.55 59.74,56.55 60.189,56.101 U2.9
  Bottom Layer w0.254: R32.2 39.11,53.69 40.98,55.56 52.25,55.56 52.9,56.21 J4.08
ESP32_SDA: J4.07 R30.2 U2.8 | length 27.8
  Top Layer w0.254: J4.07 55.44,57.733 56.103,57.07 60.1,57.07 61.459,55.711 U2.8
  Bottom Layer w0.254: R30.2 42.94,54.38 43.55,54.99 54.64,54.99 55.48,55.83 55.48,58.71 J4.07
ESP_EN: J3.01 R40.1 U2.3 | length 20.7
  Top Layer w0.254: J3.01 58.24,61.28 ; R40.1 58.24,61.28 ; U2.3 67.809,56.951 66.87,57.89 66.87,59.66 66.57,59.96 63.162,59.96 58.92,59.96 58.24,60.64 58.24,61.28
  other v1: 67.808,53.138
ESP_IO0: J2.01 R41.1 U2.25 | length 42.6
  Top Layer w0.254: J2.01 46.28,61.83 46.6,61.51 R41.1 ; U2.25 53.839,37.859 55.13,39.15 v1(56.79,39.15)
  Bottom Layer w0.254: J2.01 46.28,62.77 46.42,62.63 48.08,62.63 50.38,60.33 55.8,60.33 56.77,59.36 56.77,39.17 v1(56.79,39.15)
GND: BAT1.N C1.1 C2.1 C3.1 C4.2 C5.2 C6.1 C7.1 C8.1 C9.2 C10.2 C12.2 C13.1 C14.1 C15.1 C16.1 C17.2 CON1.1 D2.1 D3.1 D7.1 D8.1 dcconv1.7 J4.01 J5.01 J5.14 P1.4 P1.5 P1.6 Q3.2 Q4.2 R7.2 R13.1 R21.1 R22.1 R24.1 R25.1 R38.1 SW1.2 SW1.4 TRM1.3 TRM2.3 TVS1.2 TVS2.2 TVS3.2 U1.1 U2.1 U2.15 U2.38 U3.5 U4.1 U4.2 U4.3 U4.4 U4.7 U5.4 U6.1 U7.1 U8.5 | length 96.6
  Top Layer w0.254: v1(51.11,50.05) 51.157,50.097 U2.15
  Top Layer w0.5: U3.5 14.095,24.015 v1(14.96,24.88) ; v1(21.41,75.22) 22.42,74.21 23.55,74.21 23.62,74.14 R21.1 ; v1(34.54,75.05) 35.67,75.05 36.82,73.9 37.54,74.62 38.85,74.62 R24.1 ; C7.1@35.45,43.06 v1(35.45,44.31) 35.48,44.34 C8.1 ; U8.5 37.045,23.665 37.44,24.06 v1(37.5,24.06) ; v1(38.09,37.11) 38.58,36.62 39.52,36.62 C10.2 ; v1(44.2,42.29) 44.675,42.765 U5.4 ; C9.2 46.95,38.69 v1(46.99,38.65) ; U1.1 56.585,74.86 56.645,74.8 C3.1@58.57,74.8 ; C3.1 C3.1@58.57,74.8 ; v1(58.57,75.94) C3.1@58.57,74.8 ; C6.1 63.914,19.656 U4.7 U4.2 ; U2.38 70.349,30.491 J5.01 ; U2.1 70.68,53.468 J4.01 ; U4.1 U4.2 ; U4.4 U4.3 U4.2
  Top Layer w1: D2.1@7.57,23.61 8.84,24.88 v1(14.96,24.88) ; dcconv1.7 13.65,38.95 C12.2 ; 13.51,38.95 C16.1 ; U7.1 13.565,41.955 C16.1 ; v1(16.02,53.12) 14.75,53.12 13.88,52.25 13.88,48.14 11.54,45.8 11.54,42.7 12.23,42.01 C16.1 ; v1(20.95,22.8) 24.14,22.8 D3.1 ; v1(43.61,22.52) 46.75,22.52 D8.1 ; C4.2 70.68,61.22 J4.01
  other v1: 68.129,19.656 29,23.33 22.44,41.97 19.89,59.22
IGND: C11.2 dcconv1.1 J-IN1.1 J-IN1.3 TERM1.4 TERM2.4 | length 105.8
  Top Layer w1: dcconv1.1 9.23,60.84 12.77,64.38 C11.2 ; TERM1.4 TERM1.4@22.283,5.3 ; TERM2.4@38.527,5.3 TERM2.4
  Bottom Layer w1: dcconv1.1 5.76,54.19 5.76,10.28 6.6,9.44 20.49,9.44 22.255,7.675 TERM1.4 22.255,3.615 23.54,2.33 37.22,2.33 38.535,3.645 TERM2.4
  other v1: 13.43,69.95 14.41,69.95 13.46,70.9 14.44,70.96
IO2: CON1.9 J5.12 U2.24 | length 42
  Top Layer w0.254: CON1.9 29.51,47.34 30.819,46.031 30.819,42.451 31.86,41.41 31.86,40.02 34.59,37.29 38,33.88 v1(41.94,33.88) ; J5.12 42.74,31.18 43.37,31.81 44.3,31.81 45.58,33.09 49.88,33.09 52.589,35.799 U2.24
  Bottom Layer w0.5: v1(41.94,33.88) 42.74,33.08 J5.12
IO4: CON1.5 J5.11 U2.26 | length 36.4
  Top Layer w0.254: CON1.5 28.14,37.37 29.86,37.37 35.61,31.62 38.42,31.62 38.94,31.1 38.94,29.27 39.37,28.84 45.13,28.84 45.35,29.06 45.35,30.09 J5.11 45.28,31.64 46.115,32.475 50.255,32.475 52.07,34.29 54.42,34.29 55.109,34.979 U2.26
IO5: J5.08 U2.29 U8.1 | length 24.4
  Top Layer w0.254: J5.08 52.9,32.2 53.35,32.65 56.69,32.65 58.919,34.879 U2.29
  Top Layer w0.5: U8.1 51.53,26.89 52.9,28.26 J5.08
IO12: CON1.6 J4.13 U2.14 | length 53.8
  Top Layer w0.254: J4.13 40.2,55.39 40.73,54.86 46.09,54.86 47.6,53.35 53.839,53.35 U2.14
  Bottom Layer w0.254: CON1.6 26.95,39.84 26.42,40.37 26.42,58.6 27.12,59.3 33.17,59.3 35.325,57.145 38.595,57.145 J4.13
IO13: CON1.4 J4.14 U2.16 | length 67.3
  Top Layer w0.254: J4.14 35.18,58.75 34.3,57.87 34.3,54.66 35.37,53.59 45.52,53.59 47.1,52.01 48.88,52.01 49.94,50.95 49.94,49.48 50.593,48.827 U2.16
  Bottom Layer w0.254: CON1.4 26.37,34.84 25.91,35.3 25.91,59.17 26.66,59.92 33.717,59.92 34.887,58.75 J4.14
IO14: CON1.3 J4.12 U2.13 | length 55.4
  Top Layer w0.254: J4.12 42.74,56.06 43.225,55.575 46.325,55.575 47.49,54.41 54.77,54.41 55.109,54.071 U2.13
  Bottom Layer w0.254: CON1.3 31.512,32.342 40.15,40.98 40.15,48.43 39.21,49.37 38.09,49.37 37.12,50.34 37.12,54.69 37.81,55.38 39.37,55.38 J4.12
IO15: CON1.7 J5.13 U2.23 | length 37.3
  Top Layer w0.254: CON1.7 30.14,40.31 30.14,38.91 36.61,32.44 39.63,32.44 40.2,32.44 ; J5.13 40.2,32.44 ; U2.23 51.567,39.937 50.52,38.89 50.52,34.63 49.68,33.79 45.24,33.79 43.89,32.44 40.2,32.44
IO16: J5.10 U2.27 U3.1 | length 77.6
  Top Layer w0.254: J5.10 47.82,31.43 48.32,31.93 50.51,31.93 52.27,33.69 55.15,33.69 56.379,34.919 U2.27
  Top Layer w0.5: U3.1 21.916,27.27 v1(22.208,26.978) ; v1(55.56,15) 55.58,15.02 v1(55.58,18.55)
  Bottom Layer w0.5: v1(22.208,26.978) 23.062,26.978 24.38,25.66 24.38,18.03 25.67,16.74 51.14,16.74 ; J5.10 47.82,27.37 55.58,19.61 v1(55.58,18.55) ; 51.135,16.735 52.87,15 v1(55.56,15)
IO17: J5.09 U2.28 U3.4 | length 74.5
  Top Layer w0.254: J5.09 50.36,30.99 52.55,33.18 55.92,33.18 57.649,34.909 U2.28
  Top Layer w0.5: U3.4 14.095,29.525 14.96,30.39 19.23,30.39 20.25,29.37 v1(22.11,29.37) ; v1(51.51,18.91) 54.52,21.92 v1(54.56,21.92)
  Bottom Layer w0.5: v1(22.11,29.37) 23.75,29.37 26.06,27.06 26.06,19.1 26.63,18.53 51.13,18.53 v1(51.51,18.91) ; J5.09 50.36,26.12 v1(54.56,21.92)
IO18: J5.07 U2.30 U3.2 U3.3 | length 75
  Top Layer w0.254: J5.07 55.44,31.65 55.9,32.11 57.42,32.11 60.189,34.879 U2.30
  Top Layer w0.5: U3.3 16,27.27 ; U3.2 16,27.27 ; v1(22.19,28.24) 19.83,28.24 18.65,29.42 16.43,29.42 16,28.99 16,27.27 ; v1(52,17.47) 54.22,17.47 v1(54.28,17.41)
  Bottom Layer w0.5: v1(22.19,28.24) 23.55,28.24 25.19,26.6 25.19,18.5 26.18,17.51 51.96,17.51 v1(52,17.47) ; v1(54.28,17.41) 56.42,17.41 56.69,17.68 56.69,20.06 56.05,20.7 56.05,29.55 J5.07
IO19: J5.06 R42.1 U2.31 | length 75.8
  Top Layer w0.254: R42.1 17.14,56.05 18.09,55.1 22.64,55.1 23.53,54.21 23.53,52.07 23,51.54 23,48.65 25.59,46.06 29.05,46.06 30.08,45.03 30.08,41.92 30.98,41.02 30.98,39.64 37.52,33.1 43.56,33.1 44.85,34.39 48.85,34.39 v1(49.41,34.95) ; v1(56.77,37.94) 56.86,38.03 61.33,38.03 61.459,37.901 U2.31 61.459,35.029 57.98,31.55 J5.06
  Bottom Layer w0.5: v1(49.41,34.95) 49.41,36.08 51.27,37.94 v1(56.77,37.94)
IO21: J5.05 R17.2 U2.33 | length 13.8
  Top Layer w0.5: U2.33 63.999,34.909 63.41,34.32 60.52,31.43 J5.05 60.52,29.22 62.03,27.71 63.52,27.71 R17.2
IO22: J5.04 R16.2 U2.36 | length 14.3
  Top Layer w0.5: J5.04 63.3,30.16 67.44,34.3 67.809,34.669 U2.36
  Bottom Layer w0.5: v1(61.33,24.16) 61.33,26.29 63.06,28.02 J5.04
IO23: J5.03 U2.37 U8.4 | length 45.7
  Top Layer w0.5: U8.4 37.045,25.535 37.52,25.06 41.97,25.06 42.85,25.94 53.88,25.94 v1(57.41,22.41) ; J5.03 65.6,30.43 69.079,33.909 U2.37
  Bottom Layer w0.5: v1(57.41,22.41) 64.05,22.41 65.6,23.96 J5.03
IO25: J4.09 R37.2 R39.1 U2.10 | length 82.4
  Top Layer w0.254: J4.09 50.36,56.22 50.55,56.03 58.48,56.03 58.919,55.591 U2.10 58.919,50.249 v1(58.88,50.21)
  Bottom Layer w0.254: v1(34.07,26.62) 46.02,26.62 46.54,27.14 46.54,31.58 47.05,32.09 58.05,32.09 58.9,32.94 58.9,50.19 v1(58.88,50.21) ; R39.1 43,60.74 44.02,59.72 44.02,56.83 44.78,56.07 50.279,56.07 50.36,56.151 J4.09
IO34: CON1.10 J4.05 R43.1 SW1.1 SW1.3 U2.6 | length 75.3
  Top Layer w0.254: v2(23.91,49.86) 23.93,49.84 36,49.84 38.28,52.12 44.92,52.12 46.243,50.798 48.312,50.798 48.78,50.33 48.78,47.62 v1(50.05,46.35) ; v1(55.84,46.41) 58.46,46.41 63.999,51.949 U2.6 63.999,55.271 J4.05
  Bottom Layer w0.254: R43.1 19.91,43.57 22.18,45.84 22.18,48.13 v2(23.91,49.86) ; CON1.10@27.72,49.84 CON1.10
  Bottom Layer w0.5: SW1.3 SW1.1 18.63,43.43 R43.1 ; v1(50.05,46.35) 50.11,46.41 v1(55.84,46.41)
IO35: CON1.11 J4.06 U2.7 | length 49.6
  Top Layer w0.254: CON1.11 35.022,52.342 35.57,52.89 45.31,52.89 46.835,51.365 48.625,51.365 49.34,50.65 49.34,48.8 v1(50.1,48.04) ; v1(55.84,48.05) 58.77,48.05 62.729,52.009 U2.7 62.729,55.311 60.46,57.58 58.29,57.58 57.98,57.89 J4.06
  Bottom Layer w0.5: v1(50.1,48.04) 50.11,48.05 v1(55.84,48.05)
IO36: CON1.12 J4.03 U2.4 | length 68.8
  Top Layer w0.254: CON1.12 CON1.12@28.456,55.19 ; v1(35.6,55.19) 36.58,54.21 45.86,54.21 47.39,52.68 50.795,52.68 51.965,51.51 53.61,51.51 54.03,51.09 54.03,42.03 55.65,40.41 65.06,40.41 66.539,41.889 U2.4 66.539,56.561 65.6,57.5 J4.03 J4.03@65.6,59.19
  Bottom Layer w0.5: CON1.12 35.254,54.844 v1(35.6,55.19)
IO39: J4.04 U2.5 | length 6.5
  Top Layer w0.254: J4.04 65.269,56.541 U2.5
NC_1: REL2.5 TRM3.3 | length 10.7
  Top Layer w1: TRM3.3 38.04,80.35 REL2.5
NC_2: REL1.5 TRM4.3 | length 11.3
  Top Layer w1: TRM4.3 21.09,83.72 24.46,80.35 REL1.5
NetC3_2: C3.2 R1.2 U1.4 | length 11.1
  Top Layer w0.5: U1.4 52.775,73.185 54.76,71.2 58.57,71.2 ; R1.2 58.57,70.25 58.57,70.74 58.57,71.43 C3.2@58.57,71.77 ; C3.2@58.57,71.77 C3.2 C3.2@58.57,71.77
NetC7_2: C7.2 U5.1 XTAL2.2 | length 6
  Top Layer w0.5: XTAL2.2 38.197,44.881 38.197,43.907 37.45,43.16 C7.2 38.089,43.749 U5.1
NetC8_2: C8.2 U5.2 XTAL2.1 | length 9
  Top Layer w0.5: C8.2 35.491,47.499 XTAL2.1 40.159,45.69 41.5,45.69 42.135,45.055 U5.2
NetD4_1: D4.1 Q3.3 REL1.2 | length 12.7
  Top Layer w1: Q3.3 21.19,72.168 20.46,71.438 REL1.2 20.46,68.81 23.17,66.1 23.17,64.17 D4.1
NetD5_1: D5.1 Q4.3 REL2.2 | length 10.8
  Top Layer w1: D5.1 33.15,62.91 REL2.2 34.46,71.46 Q4.3@34.46,72.75
NetJ2_02: J2.02 Q1.3 | length 1.7
  Top Layer w0.5: Q1.3 48.686,65.128 48.686,63.844 J2.02
NetJ3_02: J3.02 Q2.3 | length 1.6
  Top Layer w0.5: J3.02 55.77,64.03 55.77,65.454 Q2.3
NetL1_1: L1.1 R20.1 R42.2 | length 27.9
  Top Layer w0.254: R42.2 17.97,62.32 L1.1 18.56,63.27 18.56,75.5 19.54,76.48 27.09,76.48 27.89,75.68 R20.1
NetL1_2: L1.2 R22.2 | length 3.2
  Top Layer w0.254: R22.2 22.05,59.35 L1.2
NetL2_1: L2.1 R23.1 R39.2 | length 23.1
  Top Layer w0.254: L2.1 45.41,66.91 45.41,72.82 43.42,74.81 41.19,74.81 R23.1
  Bottom Layer w0.254: R39.2 36.28,61.523 37.057,62.3 L2.1
NetL2_2: L2.2 R25.2 | length 2.8
  Bottom Layer w0.254: L2.2 44.65,60.99 R25.2
NetLED1_2: LED1.2 R2.1 | length 2.1
  Top Layer w0.5: LED1.2 63.035,70.705 63.035,72.445 R2.1
NetLED2_2: LED2.2 R3.1 | length 2.1
  Top Layer w0.5: LED2.2 63.16,68.34 R3.1
NetLED3_2: LED3.2 R7.1 | length 2.2
  Top Layer w0.5: R7.1 18.03,53.13 LED3.2
NetQ1_1: Q1.1 R5.2 | length 9.9
  Top Layer w0.254: Q1.1 49.98,66.755 49.98,65.1 49.98,64.05 51.04,62.99 53.35,62.99 53.57,63.21 53.57,65.07 R5.2
NetQ2_1: Q2.1 R8.2 | length 13.1
  Top Layer w0.254: R8.2 51.25,65.1 v1(52.46,63.89) ; v1(52.44,62.09) 55.66,62.09 56.99,63.42 56.99,67.295 Q2.1
  Bottom Layer w0.254: v1(52.44,62.09) 52.46,62.11 v1(52.46,63.89)
NetQ3_1: Q3.1 R20.2 R21.2 | length 4.6
  Top Layer w0.5: Q3.1 23.55,72.31 23.72,72.14 R21.2 ; R21.2@25.95,72.15 27.88,72.15 R20.2
NetQ4_1: Q4.1 R23.2 R24.2 | length 5
  Top Layer w0.254: Q4.1 37.4,72 38.21,72.81 R24.2 R23.2
NetR9_1: R9.1 R10.1 U3.6 | length 7.9
  Top Layer w0.5: R10.1 11.15,20.75 R9.1 11.46,20.54 14.88,20.54 15.365,21.025 U3.6
NetR12_1: R12.1 R13.2 U3.7 | length 8.2
  Top Layer w0.5: U3.7 16.635,20.895 17.05,20.48 20.81,20.48 21.04,20.71 R12.1
NetR14_1: R14.1 R16.1 U4.6 | length 4.9
  Top Layer w0.5: R16.1 63.69,22.16 64.924,20.926 U4.6
NetR15_1: R15.1 R17.1 U4.5 | length 5
  Top Layer w0.5: U4.5 66.656,22.196 67.18,22.72 R15.1 R17.1
NetR27_1: R27.1 R29.1 U5.5 | length 6.5
  Top Layer w0.5: v1(43.02,51.16) 44,51.16 44.675,50.485 U5.5 47.001,48.931 R27.1
NetR28_1: R28.1 R31.1 U5.6 | length 14.1
  Top Layer w0.254: v1(39.11,51.18) 40.94,51.18 41.79,50.33 43.05,50.33 43.405,49.975 U5.6 43.405,46.975 43.84,46.54 44.93,46.54 46.11,45.36 46.11,43.99 46.55,43.55 R28.1
NetR33_1: R33.1 R34.1 U8.6 | length 8
  Top Layer w0.5: R34.1 34.03,20.45 R33.1 34.36,20.18 35.67,20.18 38.02,20.18 38.35,20.51 38.35,22.055 U8.6
NetR36_1: R36.1 R38.2 U8.7 | length 7.8
  Top Layer w0.5: U8.7 39.585,20.505 39.94,20.15 41.74,20.15 43.24,20.15 R38.2 43.64,20.49 R36.1
NetR37_1: R37.1 U8.2 U8.3 | length 10.7
  Top Layer w0.5: R37.1 35.36,24.62 35.74,25 35.74,28.3 36.18,28.74 37.75,28.74 38.315,28.175 U8.3 U8.2
NO_1: REL2.4 TRM3.1 | length 18.5
  Top Layer w1: REL2.4 33.15,81.91 31.9,83.16 31.9,85.78 33.34,87.22 40.43,87.22 41.71,85.94 TRM3.1
NO_2: REL1.4 TRM4.1 | length 18.3
  Top Layer w1: REL1.4 20.46,80.85 18.86,82.45 18.86,85.54 20.2,86.88 27.71,86.88 28.71,85.88 TRM4.1
PCF8365_SCL: R31.2 R32.1 | length 1.9
  Bottom Layer w0.254: R32.1 41.13,53.12 R31.2
PCF8365_SDA: R29.2 R30.1 | length 1.9
  Bottom Layer w0.254: R30.1 44.95,53.14 R29.2
RS485_2_OUT_A: D7.2 R34.2 R35.2 TERM2.2 | length 22.5
  Top Layer w1: D7.2 28.99,16.81 29.87,15.93 30.87,15.93 ; TERM2.2@31,5.385 TERM2.2 30.915,15.885 30.87,15.93 ; 36.935,18.6 36.935,17.185 35.68,15.93 30.87,15.93
RS485_2_OUT_B: D8.2 R35.1 R36.2 TERM2.3 | length 25.7
  Top Layer w1: TERM2.3 34.725,12.565 37,14.84 38.62,14.84 39.8,16.02 40.74,16.02 ; 40.74,18.6 40.74,16.02 ; D8.2 47.46,17.04 46.44,16.02 40.74,16.02
RS485_OUT_A: D2.2 R10.2 R11.2 TERM1.2 | length 23.5
  Top Layer w1: D2.2 7.58,15.73 13.55,15.73 14.125,16.305 ; 14.125,18.8 14.125,16.305 ; TERM1.2 14.615,5.32 14.615,12.815 14.125,13.305 14.125,16.305
RS485_OUT_B: D3.2 R11.1 R12.2 TERM1.3 | length 23.3
  Top Layer w1: R11.1 19.03,18.8 R12.2 19.04,16.46 ; TERM1.3 19.04,5.895 19.04,16.46 ; D3.2 24.57,16.77 23.77,15.97 19.53,15.97 19.04,16.46
RTC_BATT: BAT1.P C10.1 D6.2 | length 13.8
  Top Layer w0.254: C10.1 41.69,35.4 42.04,35.05 D6.2 47.78,35.05 49.71,36.98 v1(49.71,40.8)
RTC_VDD: D6.3 U5.8 | length 18.6
  Top Layer w0.254: U5.8 40.865,47.795 43.05,45.61 44.85,45.61 45.6,44.86 45.6,42.87 48.14,40.33 48.14,37.3 46.84,36 D6.3
RTS: Q2.2 R5.1 U1.14 | length 3.1
  Top Layer w0.254: U1.14 53.87,69.355 53.87,67.556 Q2.2
RXD: R2.2 R4.1 U1.3 | length 13.3
  Top Layer w0.5: U1.3 54.045,76.525 54.73,77.21 60.7,77.21 61.17,76.74 R2.2
RXD0: R6.2 U2.34 | length 33.4
  Bottom Layer w0.254: v1(63.24,63.82) 63.23,63.81 63.23,60.65 64.34,59.54 64.34,58.02 60.38,54.06 60.38,39.79 62.14,38.03 64.02,38.03 65.269,36.781 v1(65.269,35.637)
TXD: R3.2 R6.1 U1.2 | length 14.9
  Top Layer w0.254: v1(60.16,67.27) 60.43,67.27 R3.2@61.155,66.545
  Top Layer w0.5: U1.2 55.315,73.765 v1(55.36,73.72) ; R6.1 61.155,64.515 R3.2@61.155,66.545
  Bottom Layer w0.5: v1(55.36,73.72) 55.36,69.06 57.17,67.25 60.14,67.25 v1(60.16,67.27)
TXD0: R4.2 U2.35 | length 47.8
  Top Layer w0.254: v1@66.04,63.3 v1@66.041,63.301
  Top Layer w0.5: R4.2 64.18,74.52 64.94,73.76 64.94,64.403 v1(66.04,63.303)
  Bottom Layer w0.254: v1(66.04,63.303) 66.04,60.25 66.89,59.4 66.89,58.13 66.25,57.49 64.96,57.49 60.95,53.48 60.95,40.02 62.38,38.59 64.58,38.59 66.539,36.631 v1(66.539,35.637)
VCC: C12.1 C13.2 C15.2 CON1.2 D1.C D4.2 D5.2 dcconv1.6 REL1.3 REL2.3 TRM1.1 TRM2.1 U6.3 U7.3 | length 225.6
  Top Layer w1: dcconv1.6 7.59,41.49 5.93,39.83 5.93,34.59 7.51,33.01 18.67,33.01 20.21,34.55 20.21,36.79 C12.1 ; U7.3 20.22,41.91 20.22,37.38 C12.1 ; v1(22.44,43.97) 23.8,43.97 25.1,42.67 25.1,37.09 25.1,30.84 26,29.94 28.012,29.94 CON1.2 ; 24.7,37.09 C12.1 ; REL1.3 30.46,68.81 29.62,67.97 D4.2 29.62,60.74 30.08,60.28 35.45,60.28 37.77,62.6 D5.2 38.32,62.63 43.15,67.46 REL2.3
  Bottom Layer w0.5: U6.3 20.265,54.135 20.72,53.68 C13.2 25.2,53.68 ; v1(22.44,43.97) 24.02,43.97 25.2,45.15 25.2,53.68 ; REL1.3 30.46,65.85 25.2,60.59 25.2,53.68 ; REL2.3 43.15,68.81 45.564,66.396 65.724,66.396 v1(66.63,65.49)
  Bottom Layer w1: dcconv1.6 9.35,41.61 14.78,41.61 16.36,40.03 16.36,30.92 23.25,24.03 23.25,15.6 27.52,11.33 39.21,11.33 43.38,7.16 TRM1.1 43.38,3.33 44.52,2.19 55.11,2.19 55.85,2.93 TRM2.1 TRM2.1@55.832,5.3
VUSB: D1.A P1.1 TVS1.1 | length 24.1
  Top Layer w0.5: v1(70.33,67.86) 71.19,67.86 71.345,67.705 D1.A
  Bottom Layer w0.5: P1.1 58,79.342 58,78.92 62.39,74.53 67.47,69.45 TVS1.1 68.31,68.74 69.19,67.86 v1(70.33,67.86)
XTALL1: C1.2 U1.7 XTAL1.1 | length 14
  Top Layer w0.254: U1.7 48.965,80.048 48.986,80.069 48.986,80.656 XTAL1.1
  Bottom Layer w0.254: C1.2 48.49,79.63 48.519,79.659 48.519,79.838 49.32,80.64 XTAL1.1
XTALL2: C2.2 U1.8 XTAL1.2 | length 34.2
  Top Layer w0.254: U1.8 47.695,84.445 XTAL1.2
  Bottom Layer w0.254: C2.2 48.51,70.46 49.29,69.68 51.91,69.68 52.36,70.13 52.36,81.33 49.32,84.37 XTAL1.2
pads on no net: BAT1. CON1.13 dcconv1.3 dcconv1.5 dcconv1.8 U1.9 U1.10 U1.11 U1.12 U1.15 U2.17 U2.18 U2.19 U2.20 U2.21 U2.22 U2.32 U2.39_1 U2.39_2 U2.39_3 U2.39_4 U2.39_5 U2.39_6 U2.39_7 U2.39_8 U2.39_9 U2.39_10 U2.39_11 U2.39_12 U2.39_13 U2.39_14 U2.39_15 U2.39_16 U2.39_17 U2.39_18 U2.39_19 U2.39_20 U2.39_21 U5.3 U5.7

## Polygon pours and split planes (outlines as drawn)
IGND on Bottom Layer "IGND_L02_P002" (solid, remove dead copper, pour order 2): 1.866,52.88 1.866,9.114 2.03,8.95 6.52,8.95 6.52,52.88
IGND on Bottom Layer "IGND_L02_P000" (solid, remove dead copper, pour order 0): 11.99,52.88 11.99,68.26 15.15,68.26 15.15,89.6 15.13,89.62 0,89.62 0,52.88 1.5,52.88
GND on Bottom Layer "GND_L02_P001" (solid, remove dead copper, pour order 1): 74.62,0.09 74.62,89.68 74.51,89.57 18.45,89.57 18.45,67.09 18.56,66.98 18.51,66.93 13.33,66.93 13.33,45.48 13.23,45.38 7.06,45.38 7.06,0.09 0,0.09 0.09,0.09

## Keep-outs
Keep-Out Layer:
  lines w0.127: 0,85.589 cw(c0.016,85.589) 0.004,85.6 ; 0.001,3.721 ccw(c0.056,3.721) 0.017,3.682 ; 1.503,18.55 ccw(c1.499,18.554) 1.505,18.554 ; 3.682,89.583 cw(c3.712,89.552) 3.712,89.596 ; 70.888,0.004 ccw(c70.888,0.048) 70.918,0.017 ; 73.091,18.55 ccw(c73.079,18.562) 73.096,18.562 ; 74.583,85.918 cw(c74.547,85.883) 74.598,85.883 ; 74.596,16.803 cw(c74.605,16.803) 74.598,16.809
  lines w0.2: 0,85.589 0,72.787 cw(c-0.25,71.05) 1.505,71.05 1.505,18.554 ; 0.001,3.721 0.001,16.815 ccw(c-0.25,18.55) 1.503,18.55 ; 0.004,85.6 cw(c4,85.6) 3.682,89.583 ; 0.017,3.682 ccw(c4,4) 4,0.004 70.888,0.004 ; 3.712,89.596 70.6,89.596 cw(c70.6,85.6) 74.583,85.918 ; 5.403,4.91 cw(c3.8,4.95) 5.404,4.96 ; 5.403,84.61 cw(c3.8,84.65) 5.404,84.66 ; 70.918,0.017 ccw(c70.6,4) 74.596,4 74.596,16.803 ; 72.403,4.91 cw(c70.8,4.95) 72.404,4.96 ; 72.403,84.61 cw(c70.8,84.65) 72.404,84.66 ; 73.091,18.55 ccw(c74.85,18.55) 74.598,16.809 ; 73.096,18.562 73.096,71.05 cw(c74.85,71.05) 74.598,72.785 74.598,85.883

## Other copper
Bottom Layer:
  pour cut-out: 51.59,34.64 73.1,34.64 73.1,54.45 51.59,54.45

## Silkscreen, mask and mechanical layers (free items; w line width, h text height)
Top Overlay:
  circle w0.2: c3.8,84.65 r1.6
  circle w0.2: c70.8,4.95 r1.6
  circle w0.2: c3.8,4.95 r1.6
  circle w0.2: c70.8,84.65 r1.6
  lines w0.1: 20.54,61.85 20.54,62.84 ; 20.56,61.86 20.99,62.29 ; 20.56,62.85 20.99,62.42 ; 20.99,61.86 20.99,62.82 ; 28.08,60.61 28.08,64.55 ; 36.32,60.66 36.32,64.6 ; 42.25,61.82 42.25,62.78 ; 42.25,62.25 41.82,61.82 41.82,62.81 42.25,62.38
  lines w0.2: 6.65,0 6.65,12.5 67.95,12.5 67.95,0.059 ; 6.65,89.594 6.65,77.1 67.95,77.1 67.95,89.594 ; 0,4 ccw(c4,4) 4,0 70.6,0 ccw(c70.6,4) 74.6,4 74.6,16.818 cw(c74.85,18.55) 73.1,18.55 73.1,71.05 cw(c74.85,71.05) 74.6,72.782 74.6,85.6 ccw(c70.6,85.6) 70.6,89.6 4,89.6 ccw(c4,85.6) 0,85.6 0,72.782 cw(c-0.25,71.05) 1.5,71.05 1.5,18.55 cw(c-0.25,18.55) 0,16.818 0,4
  text "NC" at 21.76,82.95 h1 r180
  text "C" at 25.17,82.95 h1 r180
  text "NO" at 29.63,82.95 h1 r180
  text "NC" at 34.75,82.94 h1 r180
  text "C" at 38.16,82.94 h1 r180
  text "NO" at 42.62,82.94 h1 r180
  text "24VDC" at 7.48,78.64 h1
  text "-" at 14.57,72.74 h1
  text "I13" at 37.12,57.37 h1 r270
  text "I26" at 47.32,57.37 h1 r270
  text "I8C" at 52.42,57.37 h1 r270
  text "I39" at 62.62,57.37 h1 r270
  text "GND" at 70.19,57.37 h1 r270
  text "I12" at 39.65,57.34 h1 r270
  text "I7D" at 54.95,57.34 h1 r270
  text "I14" at 42.25,57.31 h1 r270
  text "I25" at 49.85,57.31 h1 r270
  text "I35" at 57.55,57.31 h1 r270
  text "I36" at 65.15,57.31 h1 r270
  text "3.3" at 67.65,57.31 h1 r270
  text "I27" at 44.75,57.28 h1 r270
  text "I34" at 60.05,57.28 h1 r270
  text "GND" at 37.11,34.26 h1 r270
  text "I16" at 47.31,34.26 h1 r270
  text "I22" at 62.61,34.26 h1 r270
  text "GND" at 70.18,34.26 h1 r270
  text "I15" at 39.64,34.23 h1 r270
  text "I18" at 54.94,34.23 h1 r270
  text "I17" at 49.84,34.2 h1 r270
  text "I19" at 57.54,34.2 h1 r270
  text "I23" at 65.14,34.2 h1 r270
  text "3.3" at 67.64,34.2 h1 r270
  text "I21" at 60.04,34.17 h1 r270
  text "I4" at 44.72,33.49 h1 r270
  text "I5" at 52.44,33.49 h1 r270
  text "I2" at 42.23,33.31 h1 r270
  text "+5V  1W2  G" at 54.28,9.9 h1
  text "+24V  A   B   G" at 24.56,9.8 h1
  text "+24V  A   B   G" at 8.23,9.77 h1
  text "+5V  1W1  G" at 41.38,9.75 h1
Bottom Overlay:
  circle w0.1: c17.1,75.01 r0.347
  circle w0.1: c27.1,75.01 r0.347
  circle w0.1: c29.79,75.01 r0.347
  circle w0.1: c39.79,75.01 r0.347
  lines w0.1: 17.1,75.01 17.88,75.01
  text "REL last place" at 18.1,74.903 h1
  text "NC" at 31.09,56.84 h1
  text "I7D : IO07 / I2C SDA" at 71.94,55.81 h1
  text "IO36/PB3" at 36.92,54.44 h1
  text "I8C : IO08 / I2C SCL" at 71.94,53.46 h1
  text "IO35/PB2" at 37.04,52.05 h1
  text "IO34/PB1" at 36.92,49.26 h1
  text "IO2/WLED" at 37.07,46.78 h1
  text "3.3VPLED" at 36.87,44.53 h1
  text "IO15/CS" at 35.78,42.9 h1
  text "IO12/DC" at 35.99,38.57 h1
  text "IO4/RST" at 36.01,36.9 h1
  text "IO13/DIN" at 36.56,34.38 h1
  text "IO14/CLK" at 36.84,31.9 h1
  text "+5V" at 32.43,29.39 h1
  text "GND" at 32.24,26.79 h1

## Text inside footprints (layer, text, board x,y; h text height)
CON1: Top Overlay "1" at 25.42,25.27 h1
dcconv1: Top Overlay "Vin" at 6.563,52.412 h0.8 r270; Top Overlay "GND" at 6.563,55.46 h0.8 r270; Top Overlay "+Vo" at 6.563,42.379 h0.8 r270; Top Overlay "0V" at 6.563,39.458 h0.8 r270; Top Overlay "NC" at 6.563,44.792 h0.8 r270; Top Overlay "URB_S-6WR3" at 4.023,49.237 h0.8 r270; Top Overlay "Ctrl" at 6.563,49.999 h0.8 r270; Top Overlay "NC" at 6.563,37.045 h0.8 r270
REL1: Bottom Overlay "COM" at 20.25,68.089 h2 r180; Bottom Overlay "Ind" at 27.18,70.769 h2 r180; Bottom Overlay "Ind" at 21.59,70.819 h2 r180; Bottom Overlay "NO" at 21.51,80.979 h2 r180; Bottom Overlay "NC" at 26.91,80.939 h2 r180
REL2: Bottom Overlay "Ind" at 34.28,70.819 h2 r180; Bottom Overlay "NC" at 39.6,80.939 h2 r180; Bottom Overlay "NO" at 34.2,80.979 h2 r180; Bottom Overlay "Ind" at 39.87,70.769 h2 r180; Bottom Overlay "COM" at 32.94,68.089 h2 r180